# Altium PCB video.altium-ascii.PcbDoc (part 3 of 5)
Units mil, origin at the board's own origin, x right, y up, seen from the top; angles counter-clockwise.
Board outline 12285 x 4200 mil, 4 copper layers (top_copper, Mid-Layer 1, Mid-Layer 2, Bottom Layer), stack 68.6 mil thick; 189 components, 588 nets, 2118 pads, 808 vias.
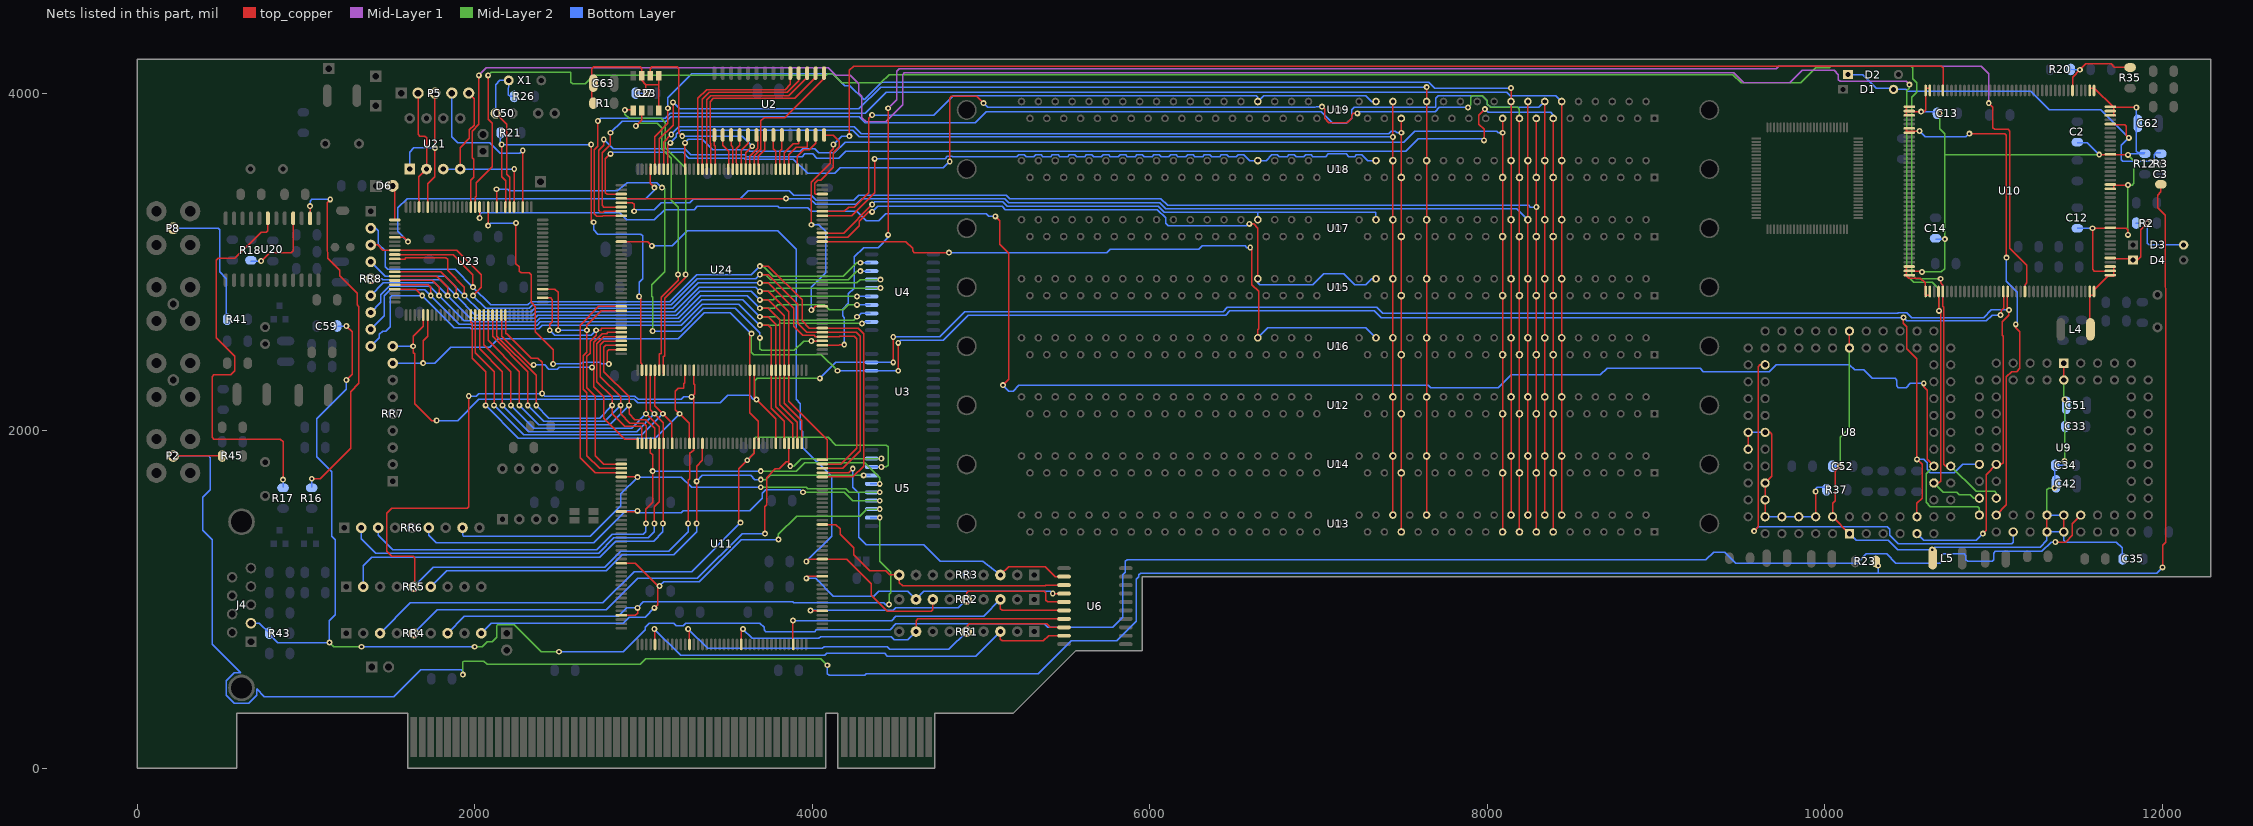
[diagram p5: the nets of this part, all layers, seen from the top]

## Via types
v1: diameter 35, hole 15.75, top_copper to Bottom Layer, 807 vias
v2: diameter 31.5, hole 15.75, top_copper to Bottom Layer, 1 vias

## Nets (pads, with @x,y where several pads share a name; then routed paths per layer and width w, separated by ;. In a path a pad name is that pad's centre, name@x,y a point inside that pad or via, vN(x,y) a via of type N, cw(c..) or ccw(c..) an arc to the next point about the centre after c; other vN are vias at no path point) (continued)
/DQ6: RR7.8 U3.8 U8.10 U9.20 U10.99 U11.92 U23.6 U24.27 | length 12913.7
  top_copper w7.87: v1(1695,2400) 1695,2533 1722,2560 U23.6@1722,2690 ; v1(3640,2575) 3630,2575 3630,2340 3630,2106 3681,2055 U11.92@3681,1943 ; v1(4510,2355) v1(4510,2520) ; v1(10465,2670) 10465,2635 10485,2615 10485,2485 10545,2425 v1(10545,1830) 10575,1800 10575,1600 10545,1570 U8.10@10545,1490 ; v1(11040,2685) 11045,2690 11045,2712 11058,2725 U10.99@11058,2802
  Mid-Layer 2 w7.87: v1(3640,2575) 3640,2465 3655,2450 4055,2450 v1(4150,2355)
  Bottom Layer w7.87: RR7.8@1515,2400 1765,2400 1860,2495 2090,2495 2140,2545 3205,2545 3360,2700 3515,2700 v1(3640,2575) ; v1(4150,2355) 4345,2355 v1(4510,2355) ; v1(4510,2520) 4525,2535 4775,2535 4925,2685 6450,2685 6475,2710 7330,2710 7370,2670 v1(10465,2670) 10485,2650 10955,2650 10990,2685 v1(11040,2685) ; v1(10545,1830) 10585,1830 10605,1810 10605,1770 10625,1750 10765,1750 10815,1800 U9.20@10915,1800
/DQ7: RR7.9 U3.9 U8.9 U9.21 U10.100 U11.88 U23.5 U24.28 | length 13091.4
  top_copper w7.87: U23.5@1696,2690 1696,2620 1636,2560 v1(1636,2500) 1636,2460 1645,2460 1645,2160 1745,2060 v1(1775,2060) ; U24.28@3656,2340 3656,2198 v1@3670,2184 ; v1(3670,2185) v1@3670,2184 ; U11.88@3784,1943 3784,2070 v1@3670,2184 ; v1(4480,2405) v1(4480,2555) ; v1(10935,1390) 10955,1410 10955,1740 U9.21@11015,1800 11045,1800 11055,1810 11055,2560 11050,2565 11050,2645 11090,2685 v1(11090,2715) 11080,2715 11080,2800 U10.100@11083,2802
  Mid-Layer 2 w7.87: v1(3670,2185) 3660,2185 3660,2295 3675,2310 v1(4045,2310)
  Bottom Layer w7.87: RR7.9@1515,2500 v1(1636,2500) ; v1(1775,2060) 1900,2060 2025,2185 2945,2185 2965,2165 3455,2165 3500,2210 3630,2210 3650,2185 v1(3670,2185) ; v1(4045,2310) 4140,2405 4345,2405 v1(4480,2405) ; v1(4480,2555) 4755,2555 4905,2705 6435,2705 6460,2730 7345,2730 7380,2695 10430,2695 10435,2700 10485,2700 10515,2670 10940,2670 10985,2715 v1(11090,2715) ; U8.9@10545,1390 10585,1350 10895,1350 v1(10935,1390)
/DQ8: RR8.9 U4.2 U11.86 U23.97 U24.32 | length 4346.9
  top_copper w7.87: U23.97@1530,2839 1651,2839 v1(1690,2800) ; v1(3690,2625) 3740,2625 3758,2607 3758,2340 3758,2132 3835,2055 U11.86@3835,1943
  Mid-Layer 2 w7.87: v1(3690,2625) 3800,2625 3810,2635 v1(4295,2635)
  Bottom Layer w7.87: RR8.9@1385,2500 1435,2550 1435,2570 1455,2590 1475,2590 1500,2615 1500,2790 1510,2800 v1(1690,2800) 1880,2610 1975,2610 1980,2605 2380,2605 2400,2625 3225,2625 3350,2750 3565,2750 v1(3690,2625) ; v1(4295,2635) 4305,2645 U4.2@4345,2645
/DQ9: RR8.8 U4.3 U11.84 U23.96 U24.33 | length 4451.3
  top_copper w7.87: U23.96@1530,2864 1726,2864 1740,2850 v1(1740,2800) ; v1(3690,2675) 3740,2675 3784,2631 3784,2340 3784,2142 3886,2040 U11.84@3886,1943
  Mid-Layer 2 w7.87: v1(3690,2675) 3790,2675 3810,2655 4245,2655 v1(4265,2675)
  Bottom Layer w7.87: RR8.8@1385,2600 1465,2680 1465,2800 1500,2835 1705,2835 v1(1740,2800) 1910,2630 1980,2630 1985,2625 2370,2625 2390,2645 3215,2645 3345,2775 3590,2775 v1(3690,2675) ; v1(4265,2675) 4270,2675 4290,2695 U4.3@4345,2695
/DQ10: RR8.7 U4.4 U11.83 U23.95 U24.34 | length 4495.8
  top_copper w7.87: U23.95@1530,2890 1750,2890 1790,2850 v1(1790,2800) ; v1(3690,2725) 3740,2725 3809,2656 3809,2340 3809,2153 3912,2050 U11.83@3912,1943
  Mid-Layer 2 w7.87: v1(3690,2725) 3775,2725 3795,2745 4070,2745 4100,2715 4185,2715 4215,2745 v1(4265,2745)
  Bottom Layer w7.87: RR8.7@1385,2700 1445,2760 1445,2805 1495,2855 1735,2855 v1(1790,2800) 1940,2650 1985,2650 1990,2645 2365,2645 2385,2665 3205,2665 3340,2800 3615,2800 v1(3690,2725) ; v1(4265,2745) U4.4@4345,2745
/DQ11: RR8.6 U4.5 U11.82 U23.94 U24.35 | length 4523.8
  top_copper w7.87: U23.94@1530,2915 1775,2915 1840,2850 v1(1840,2800) ; v1(3690,2775) 3740,2775 3835,2680 3835,2340 3835,2162 3937,2060 U11.82@3937,1943
  Mid-Layer 2 w7.87: v1(3690,2775) 3770,2775 3790,2795 v1(4265,2795)
  Bottom Layer w7.87: RR8.6@1385,2800 1460,2875 1765,2875 v1(1840,2800) 1970,2670 1990,2670 1995,2665 2355,2665 2375,2685 3195,2685 3335,2825 3640,2825 v1(3690,2775) ; v1(4265,2795) U4.5@4345,2795
/DQ12: RR8.5 U4.6 U11.80 U23.93 U24.36 | length 4907.7
  top_copper w7.87: U23.93@1530,2941 1799,2941 1890,2850 v1(1890,2800) ; v1(3690,2825) 3740,2825 3861,2704 3861,2340 3861,2174 4090,1945 4090,1828 U11.80@4078,1828
  Mid-Layer 2 w7.87: v1(3690,2825) 3770,2825 3790,2845 v1(4405,2845)
  Bottom Layer w7.87: RR8.5@1385,2900 1450,2900 1455,2895 1795,2895 v1(1890,2800) 2005,2685 2345,2685 2365,2705 3185,2705 3330,2850 3665,2850 v1(3690,2825) ; U4.6@4345,2845 v1(4405,2845)
/DQ13: RR8.4 U4.7 U11.79 U23.90 U24.45 | length 5509.6
  top_copper w7.87: U23.90@1530,3018 1535,3017 1585,3017 1593,3025 1830,3025 1840,3015 1840,2950 1940,2850 v1(1940,2800) ; v1(3690,2875) 3740,2875 3890,2725 3890,2620 3945,2565 4015,2565 4015,2557 4078,2557 4160,2557 4163,2560 4250,2560 4265,2545 4265,1897 4170,1802 U11.79@4078,1802
  Mid-Layer 2 w7.87: v1(3690,2875) 4265,2875 4285,2895 v1(4405,2895)
  Bottom Layer w7.87: RR8.4@1385,3000 1470,2915 1825,2915 v1(1940,2800) 2035,2705 2335,2705 2355,2725 3175,2725 3325,2875 v1(3690,2875) ; U4.7@4345,2895 v1(4405,2895)
/DQ14: RR8.3 U4.8 U11.78 U23.88 U24.46 | length 5113.8
  top_copper w7.87: RR8.3@1385,3100 1425,3100 1456.02,3068.98 U23.88@1526.02,3068.98 ; U23.88@1530,3069 1560,3070 1895,3070 2040,2925 2040,2850 v1(1990,2800) ; v1(3690,2925) 3740,2925 3915,2750 3915,2635 3967,2583 4078,2583 4262,2583 4285,2560 4285,1882 4180,1777 U11.78@4078,1777
  Mid-Layer 2 w7.87: v1(3690,2925) 3725,2925 3755,2895 4215,2895 4265,2945 v1(4285,2945)
  Bottom Layer w7.87: v1(1990,2800) 2065,2725 2325,2725 2345,2745 3165,2745 3320,2900 3665,2900 v1(3690,2925) ; v1(4285,2945) U4.8@4345,2945
/DQ15: RR8.2 U4.9 U11.76 U23.89 U24.47 | length 5880.2
  top_copper w7.87: U23.89@1530,3043 1872,3043 1990,2925 v1(1990,2850) ; v1(3690,2975) 3740,2975 3940,2775 3940,2650 3982,2608 4078,2608 4272,2608 4305,2575 4305,1790 4240,1726 U11.76@4078,1726
  Mid-Layer 2 w7.87: v1(3690,2975) 3710,2975 3770,2915 4185,2915 4265,2995 v1(4285,2995)
  Bottom Layer w7.87: RR8.2@1385,3200 1415,3200 1430,3185 1430,3105 1470,3065 1470,2970 1485,2955 1885,2955 v1(1990,2850) 2095,2745 2315,2745 2335,2765 3155,2765 3315,2925 3640,2925 v1(3690,2975) ; v1(4285,2995) U4.9@4345,2995
/DQ16: RR4.7 U5.2 U11.157 | length 3450.6
  top_copper w7.87: U11.157@2850,906 2952.5,906 2965,918.5 v1(2965,950)
  Mid-Layer 2 w7.87: v1(4400,1485) 4400,1225 4465,1160 4465,1040 4455,1030 v1(4455,970)
  Bottom Layer w7.87: RR4.7@1840,800 1940,900 2850,900 2900,950 v1(2965,950) 3000,985 3885,985 3890,980 4425,980 4435,970 v1(4455,970) ; U5.2@4345,1485 v1(4400,1485)
/DQ17: RR4.9 U5.3 U11.145 | length 3092
  top_copper w7.87: U11.145@2850,1214 2951,1214 v1@3085,1080 ; v1(3065,950) 3085,970 v1@3085,1080 ; v1(3095,1080) v1@3085,1080
  Mid-Layer 2 w7.87: v1(3800,1355) 3800,1385 3909,1494 4283,1494 4324,1535 v1(4400,1535)
  Bottom Layer w7.87: RR4.9@2040,800 2100,860 2880,860 2915,895 3010,895 v1(3065,950) ; v1(3095,1080) 3120,1105 3330,1105 3580,1355 v1(3800,1355) ; U5.3@4345,1535 v1(4400,1535)
/DQ18: RR6.6 U5.4 U11.133 | length 3092
  top_copper w7.87: U11.133@2850,1521 2965,1521 v1(2965,1525)
  Mid-Layer 2 w7.87: v1(3945,1635) 4190,1635 4240,1585 v1(4400,1585)
  Bottom Layer w7.87: RR6.6@1728.58,1425 1728.58,1380.46 1774.04,1335 2705,1335 2895,1525 v1(2965,1525) 2975,1515 3225,1515 3235,1525 3630,1525 3705,1600 3705,1630 3725,1650 3930,1650 v1(3945,1635) ; U5.4@4345,1585 v1(4400,1585)
/DQ19: RR6.8 U5.5 U11.125 | length 2912.5
  top_copper w7.87: U11.125@2850,1726 2965,1726 v1(2965,1725)
  Mid-Layer 2 w7.87: v1(3695,1665) 3965,1665 3975,1655 4200,1655 4220,1635 v1(4400,1635)
  Bottom Layer w7.87: RR6.8@1928.58,1425 1928.58,1380.46 1934.04,1375 2685,1375 2865,1555 2865,1625 v1(2965,1725) 3225,1725 3285,1665 v1(3695,1665) ; U5.5@4345,1635 v1(4400,1635)
/DQ20: RR6.3 U5.6 U11.117 | length 3768.2
  top_copper w7.87: v1(3015,1450) 3015,1535 3055,1575 v1(3055,1760) 3055,1856 3041,1870 U11.117@3041,1943
  Mid-Layer 2 w7.87: v1(3695,1760) 3905,1760 3955,1810 4310,1810 4400,1720 v1(4400,1685)
  Bottom Layer w7.87: RR6.3@1428.58,1425 1428.58,1380.46 1514.04,1295 2725,1295 2815,1385 3000,1385 3015,1400 v1(3015,1450) ; v1(3055,1760) v1(3695,1760) ; U5.6@4345,1685 v1(4400,1685)
/DQ21: RR5.6 U5.7 U11.105 | length 3331.9
  top_copper w7.87: v1(3315,1450) v1(3315,1700) 3315,1790 3349,1824 U11.105@3349,1943
  Mid-Layer 2 w7.87: v1(3695,1710) 3725,1710 3750,1735 v1(4305,1735)
  Bottom Layer w7.87: RR5.6@1740,1075 1835,1170 2780,1170 2875,1265 3180,1265 3315,1400 v1(3315,1450) ; v1(3315,1700) 3350,1735 3635,1735 3660,1710 v1(3695,1710) ; v1(4305,1735) U5.7@4345,1735
/DQ22: RR4.3 U5.8 U11.93 | length 4118.8
  top_copper w7.87: v1(3575,1455) 3565,1465 3565,1775 v1(3615,1825) 3656,1866 U11.93@3656,1943
  Mid-Layer 2 w7.87: v1(3615,1825) 3655,1865 3655,1950 3665,1960 4095,1960 4140,1915 4440,1915 4450,1905 4450,1795 4440,1785 v1(4410,1785)
  Bottom Layer w7.87: RR4.3@1440,800 1620,980 2760,980 2945,1165 3285,1165 v1(3575,1455) ; U5.8@4345,1785 v1(4410,1785)
/DQ23: RR4.5 U5.9 U11.85 | length 3610.6
  top_copper w7.87: v1(3720,1390) 3720,1550 3730,1560 3730,1720 3780,1775 3805,1775 3845,1815 3860,1815 ; U11.85@3861,1943 3861,1816 3860,1815 ; v1(3870,1790) 3870,1795 3860,1805 3860,1815
  Mid-Layer 2 w7.87: v1(3870,1790) 3890,1790 3935,1835 v1(4410,1835)
  Bottom Layer w7.87: RR4.5@1640,800 1780,940 2780,940 2965,1125 3320,1125 3585,1390 v1(3720,1390) ; U5.9@4345,1835 v1(4410,1835)
/DQ24: RR3.3 U6.2 U11.77 | length 1934.1
  top_copper w7.87: U11.77@4078,1751 4216,1751 v1(4240,1775) ; RR3.3@5115,1145 5165,1195 5380,1195 5440,1135 U6.2@5485,1135
  Bottom Layer w7.87: v1(4240,1775) 4240,1665 4275,1630 4275,1370 4320,1325 4660,1325 4760,1225 5010,1225 RR3.3@5115,1145
/DQ25: RR3.9 U6.3 U11.65 | length 1629.9
  top_copper w7.87: U11.65@4078,1444 4140,1444 4165,1420 4165,1385 4245,1305 4245,1265 4340,1170 4435,1170 4460,1145 RR3.9@4515,1145 4515,1100 4535,1080 5380,1080 5385,1085 U6.3@5485,1085
/DQ26: RR2.8 U6.4 U11.53 | length 1750.1
  top_copper w7.87: v1(3965,1125) 3965,1137 U11.53@4078,1137 ; v1(5425,1035) U6.4@5485,1035
  Bottom Layer w7.87: v1(3965,1125) 4020,1125 4125,1020 4365,1020 4395,1050 4565,1050 RR2.8@4615,1000 4660,1050 5410,1050 v1(5425,1035)
/DQ27: RR2.5 U6.5 U11.45 | length 1710.4
  top_copper w7.87: v1(3990,935) 3990,932 U11.45@4078,932 ; RR2.5@4915,1000 4915,1040 4925,1050 5375,1050 5385,1040 5385,995 5395,985 U6.5@5485,985
  Bottom Layer w7.87: v1(3990,935) 4480,935 4495,950 4865,950 RR2.5@4915,1000
/DQ28: RR2.3 U6.6 U11.37 | length 1869.9
  top_copper w7.87: U11.37@3886,715 v1(3886,875) ; RR2.3@5115,1000 5115,945 5125,935 U6.6@5485,935
  Bottom Layer w7.87: v1(3886,875) 4470,875 4495,900 5015,900 RR2.3@5115,1000
/DQ29: RR1.8 U6.7 U11.25 | length 2139.4
  top_copper w7.87: U11.25@3579,715 3579,825 v1(3590,825) ; RR1.8@4615,810 4615,875 4625,885 U6.7@5485,885
  Bottom Layer w7.87: v1(3590,825) 3645,770 4040,770 4050,780 4468,780 4486,762 4567,762 RR1.8@4615,810
/DQ30: RR1.5 U6.8 U11.13 | length 2483
  top_copper w7.87: v1(3265,825) 3272,825 U11.13@3272,715 ; RR1.5@4915,810 4920,815 4920,845 4930,855 5390,855 5410,835 U6.8@5485,835
  Bottom Layer w7.87: v1(3265,825) 3380,710 4060,710 4070,720 4445,720 4460,705 4810,705 RR1.5@4915,810
/DQ31: RR1.3 U6.9 U11.5 | length 2728.2
  top_copper w7.87: v1(3065,825) 3067,825 U11.5@3067,715 ; RR1.3@5115,810 5115,765 5125,755 5370,755 5400,785 U6.9@5485,785
  Bottom Layer w7.87: v1(3065,825) 3220,670 4075,670 4085,680 4430,680 4445,665 4970,665 RR1.3@5115,810
/ESVIDEO-RVB/OE_RVB-: U8.57 U9.29 | length 2700.9
  top_copper w7.87: v1(9580,1405) 9605,1430 9605,2380 9615,2390 U8.57@9645,2390
  Bottom Layer w7.87: v1(9580,1405) 9605,1430 10370,1430 10385,1415 10385,1380 10435,1330 11105,1330 11115,1340 U9.29@11115,1400
/ESVIDEO-RVB/REF+: R37.2 U8.64 U8.65 U8.66 U8.71 U8.73 U8.76 U8.78 U8.80 U8.82 | length 1294.9
  top_copper w7.87: U8.66@9545,1890 U8.64@9545,1990 ; U8.76@9645,1490 U8.73@9645,1590 U8.71@9645,1690 9685,1730 9685,1980 9675,1990 U8.65@9645,1990 ; U8.82@9945,1490 v1(9945,1640)
  Bottom Layer w7.87: U8.64@9545,1990 U8.65@9645,1990 ; U8.76@9645,1490 U8.78@9745,1490 U8.80@9845,1490 U8.82@9945,1490 ; v1(9945,1640) 9945,1655 9955,1665 10005,1665 R37.2@10005,1650
/ESVIDEO-RVB/VAA: C33.1 C34.1 C35.1 C42.1 C51.1 C52.1 L5.2 U8.1 U8.43 U8.44 U8.84 U9.1 U9.2 U9.33 U9.34 U9.35 U9.36 | length 4699
  top_copper w7.87: v1(10090,1790) 10060,1760 10060,1585 10045,1570 U8.84@10045,1490 U8.1@10145,1390 ; U8.44@10145,2490 U8.43@10145,2590 ; L5.2@10635,1245 v1(10635,1295) ; U9.33@11315,1400 U9.34@11315,1500 ; U9.35@11415,1400 U9.36@11415,1500 ; U9.2@11415,2300 U9.1@11415,2400
  Mid-Layer 2 w7.87: v1(10090,1790) 10090,1960 10145,2015 U8.44@10145,2490 ; U9.34@11315,1500 11315,1650 11325,1660 v1(11360,1660) ; U9.2@11415,2300 11415,2190 v1(11420,2185) v1(11420,1820)
  Bottom Layer w7.87: C52.1@10040,1790 v1(10090,1790) ; U8.1@10145,1390 10185,1350 10375,1350 10430,1295 v1(10635,1295) 10650,1310 11275,1310 11315,1350 U9.33@11315,1400 U9.35@11415,1400 11415,1350 11425,1340 11725,1340 11760,1305 C35.1@11760,1240 ; U9.34@11315,1500 U9.36@11415,1500 ; v1(11360,1660) 11360,1685 11360,1795 11410,1795 11420,1805 v1(11420,1820) ; C33.1@11420,2025 11420,2150 v1(11420,2185)
/F_PALIN: U10.104 U24.43 | length 9877.8
  top_copper w7.87: U24.43@4078,2506 4160,2506 4160,2510 v1(4190,2510) ; v1(4450,3160) v1(4450,3910) ; v1(10970,3940) 10995,3915 10995,3795 11005,3785 11085,3785 11095,3775 11095,3080 11195,2980 11195,2875 11185,2865 U10.104@11185,2805
  Mid-Layer 1 w7.87: v1(4450,3910) 4500,3960 4500,4130 4515,4145 9710,4145 9725,4160 10925,4160 10970,4115 v1(10970,3940)
  Bottom Layer w7.87: v1(4190,2510) 4190,2670 4180,2680 4180,2720 4215,2755 4215,2810 4250,2845 4250,3030 4305,3085 4390,3085 4450,3145 v1(4450,3160)
/graphic/14MHZOUT: U7.6 U24.95 | length 1200
  top_copper w7.87: U7.6@3040,4105 3040,4145 3050,4155 3200,4155 3210,4145 3210,3765 v1(3230,3745) ; U24.95@3605,3568 3605,3645 v1(3645,3685)
  Bottom Layer w7.87: v1(3230,3745) 3585,3745 v1(3645,3685)
/graphic/CCLK: P5.2 U21.2 U23.77 | length 737.3
  top_copper w7.87: P5.2@1665,4000 1665,3755 1675,3745 1705,3745 1715,3735 U21.2@1715,3550 1670,3505 1670,3368.87 1671,3367.87 U23.77@1671,3320
/graphic/CLK10MHz: R21.2 U23.57 U24.2 | length 2635.9
  top_copper w7.87: v1(2160,3695) 2160,3503 2183,3480 U23.57@2183,3320 ; v1(2690,3695) 2690,3250 v1(2705,3235) ; v1(2975,2795) 2985,2785 2985,2400 2990,2400 U24.2@2990,2340
  Bottom Layer w7.87: R21.2@2152.3,3765 2152.3,3702.7 v1(2160,3695) v1(2690,3695) ; v1(2705,3235) 2705,3190 2730,3165 2985,3165 2995,3155 2995,2900 2975,2880 v1(2975,2795)
/graphic/CSIO-: U23.61 U24.159 | length 1718.2
  top_copper w7.87: v1(2080,3215) U23.61@2080,3320 ; v1(2245,3230) 2245,2990 2265,2970 2265,2945 2275,2935 2325,2935 2335,2925 2335,2760 2360,2735 2360,2585 2465,2480 v1(2465,2395) ; v1(2795,2395) 2785,2405 2785,2470 2795,2480 U24.159@2850,2480
  Bottom Layer w7.87: v1(2080,3215) 2095,3230 v1(2245,3230) ; v1(2465,2395) 2630,2395 2640,2405 2740,2405 2750,2395 v1(2795,2395)
/graphic/DIN: P5.3 U21.1 U23.75 | length 958.2
  top_copper w7.87: U23.75@1722,3320 1722,3462 1765,3505 v1(1765,3675) P5.3@1765,4000
  Bottom Layer w7.87: U21.1@1615,3550 1615,3650 1640,3675 v1(1765,3675)
/graphic/DONE: P5.4 U23.53 | length 1067.6
  top_copper w7.87: U23.53@2285,3320 v1(2285,3660)
  Bottom Layer w7.87: P5.4@1865,4000 1865,3740 1900,3705 2090,3705 2152.5,3642.5 2267.5,3642.5 v1(2285,3660)
/graphic/HDOUT: U7.1 U24.7 | length 1931.1
  top_copper w7.87: v1(2890,3900) 2935,3900 U7.1@2940,3895 ; U24.7@3118,2340 3118,2440 3125,2440 3125,2785 3250,2910 v1(3250,2925)
  Mid-Layer 2 w7.87: v1(2890,3900) 2890,3875.25 2915.25,3850 3105,3850 3130,3825 3130,3675 3250,3555 v1(3250,2925)
/graphic/HDREFOUT: U7.2 U24.6 | length 1827.6
  top_copper w7.87: v1(2955,3804.94) 2990,3839.94 U7.2@2990,3896.65 ; U24.6@3093,2340 3093,2455 3105,2455 3105,2790 3205,2890 v1(3205,2925)
  Mid-Layer 2 w7.87: v1(2955,3804.94) 2972.5,3822.44 3082.56,3822.44 3110,3795 3110,3670 3165,3615 3165,3365 3205,3325 v1(3205,2925)
/graphic/IA0: U2.6 U24.94 | length 205.6
  top_copper w7.87: U24.94@3630,3568 3630,3626 3678.57,3674.57 3678.57,3741.39 U2.6@3670,3749.96
/graphic/IA1: U2.7 U24.92 | length 198.1
  top_copper w7.87: U24.92@3681,3568 3681,3625 3720,3664 U2.7@3720,3749.96
/graphic/IA2: U2.8 U24.88 | length 187.8
  top_copper w7.87: U2.8@3770,3749.96 3770,3669 3784,3655 U24.88@3784,3568
/graphic/IA3: U2.9 U24.87 | length 186.5
  top_copper w7.87: U24.87@3809,3568 3809,3655 3820,3666 U2.9@3820,3749.96
/graphic/IA4: U2.11 U24.86 | length 233.2
  top_copper w7.87: U24.86@3835,3568 3835,3645 3888.78,3698.78 3916.06,3698.78 3920,3702.72 U2.11@3920,3749.96
/graphic/IA5: U2.12 U24.85 | length 265.2
  top_copper w7.87: U24.85@3861,3568 3861,3636 3905,3680 3970,3680 U2.12@3970,3749.96
/graphic/IA6: U2.13 U24.83 | length 245.6
  top_copper w7.87: U24.83@3912,3568 3912,3625.87 3912,3627 3949.25,3664.25 3981.53,3664.25 4020,3702.72 U2.13@4020,3749.96
/graphic/IA7: U2.14 U24.78 | length 546.6
  top_copper w7.87: U2.14@4070,3749.96 4123.43,3749.96 4123.47,3750 4159.37,3714.1 4159.37,3680.9 4125,3646.53 4125,3560 4050,3485 4033.31,3485 4014.23,3465.92 4014.23,3407.77 4020,3402 U24.78@4078,3402
/graphic/IA8: U2.15 U24.93 | length 794.8
  top_copper w7.87: U24.93@3656,3568 3656,3627.74 3695,3666.74 3695,3835 3715,3855 3836.62,3855 4070,4088.38 U2.15@4070,4120.04
/graphic/IA9: U2.5 U24.96 | length 198.6
  top_copper w7.87: U24.96@3579,3568 3580,3585 3580,3662.59 3620,3702.59 U2.5@3620,3749.96
/graphic/ICAS-: U2.17 U24.104 | length 1071
  top_copper w7.87: U24.104@3374,3568 3374,3961 3398,3985 3862.52,3985 3970,4092.48 U2.17@3970,4120.04
/graphic/ID0: U2.1 U24.102 | length 184.1
  top_copper w7.87: U2.1@3420,3750 3420,3690 3425,3685 U24.102@3425,3568
/graphic/ID1: U2.2 U24.99 | length 196.8
  top_copper w7.87: U2.2@3470,3750 3470,3690 3505,3655 3505,3585 U24.99@3502,3568
/graphic/ID2: U2.18 U24.105 | length 1059.3
  top_copper w7.87: U24.105@3349,3568 3349,3964 3389.75,4004.75 3851.96,4004.75 3920,4072.8 U2.18@3920,4120.04
/graphic/ID3: U2.19 U24.106 | length 1050.1
  top_copper w7.87: U24.106@3323,3568 3323,3968 3375.63,4020.63 3839.1,4020.63 3870,4051.53 U2.19@3870,4120.04
/graphic/IOE-: U2.16 U24.103 | length 1095.6
  top_copper w7.87: U24.103@3400,3568 3400,3698.72 3395,3703.72 3395,3950 3414.25,3969.25 3896.77,3969.25 4020,4092.48 U2.16@4020,4120.04
/graphic/IRAS-: U2.4 U24.97 | length 190.4
  top_copper w7.87: U24.97@3553,3568 3550,3600 3550,3670 3570,3690 U2.4@3570,3749.96
/graphic/IWR-: U2.3 U24.98 | length 186.3
  top_copper w7.87: U2.3@3520,3750 3520,3690 3530,3680 3530,3585 U24.98@3528,3568
/graphic/LED: D6.2 U23.81 | length 206.5
  top_copper w7.87: D6.2@1515,3450 1526.02,3438.98 U23.81@1526.02,3248.11
/graphic/PROG*: P5.5 U21.3 U21.4 U23.55 | length 1148.8
  top_copper w7.87: U21.4@1915,3550 1915,3677.22 1969.25,3731.47 1969.25,3781.52 1998.46,3810.74 1998.46,3966.54 P5.5@1965,4000 ; U23.55@2234,3320 2234,3399 2235,3400 v1(2235,3550)
  Bottom Layer w7.87: U21.3@1815,3550 U21.4@1915,3550 v1(2235,3550)
/graphic/RESERV1: U23.59 U24.44 | length 3280.5
  top_copper w7.87: v1(2130,3430) 2130,3320 U23.59@2132,3320 ; v1(3995,2531) U24.44@4078,2531
  Mid-Layer 2 w7.87: v1(3055,2590) 3055,2790 3050,2795 3050,2865 3125,2940 3125,3435 v1(3110,3440) ; v1(3690,2550) 3690,2486 3700,2476 3895,2476 3950,2531 v1(3995,2531)
  Bottom Layer w7.87: v1(2130,3430) 2195,3430 2205,3420 2845,3420 2905,3470 3080,3470 v1(3110,3440) ; v1(3055,2590) 3220,2590 3355,2725 3545,2725 3690,2580 v1(3690,2550)
/graphic/VOSC: C23.1 C63.1 R1.1 U7.4 U7.5 U7.7 | length 1012.8
  top_copper w7.87: R1.1@2700,3940 2695,3955 2695,4050 2695,4145 2705,4155 2980,4155 2990,4145 U7.7@2990,4105 ; U7.7@2990,4103.35 2990,4075 3015,4050 ; v1(3015,4000) 3015,4050 ; U7.4@3090,3895 U7.5@3090,4105 ; 3090,4050 3015,4050
  Bottom Layer w7.87: C23.1@2950,4000 v1(3015,4000)
/graphic/X_DIN: U23.85 U24.117 | length 2024.1
  top_copper w7.87: U23.85@1530,3146 1540,3145 1580,3145 v1(1605,3120) ; U24.117@3040,3565 3040,3465 v1(3065,3440)
  Bottom Layer w7.87: v1(1605,3120) 1545,3180 1545,3320 1600,3375 3015,3375 3065,3425 v1(3065,3440)
/graphic/XTAL_I: C50.1 R26.1 U23.56 X1.2 | length 971
  top_copper w7.87: C50.1@2125,3880 2189.31,3815.69 2189.31,3518.69 2208,3500 U23.56@2208,3320
  Bottom Layer w7.87: C50.1@2125,3880 2125,4050 2150,4075 X1.2@2202.09,4075 2200,3990 2210,3980 R26.1@2230,3980
/GREEN_IN: C3.2 P2.1 R23.1 R45.1 | length 16712.9
  top_copper w7.87: P2.1@215,1850 R45.1@500,1850 ; R23.1@10305,1225 10315,1225 v1(10315,1200) ; C3.2@11990,3455 11990,3415 11970,3395 11970,3320 12015,3275 12015,2850 12020,2845 12020,1340 12000,1320 v1(12000,1190)
  Mid-Layer 2 w7.87: v1(1930,555) 1930,630 1935,635 2055,635 2075,615 2980,615 3015,650 4050,650 v1(4090,610)
  Bottom Layer w7.87: P2.1@215,1850 425,1850 435,1840 435,1650 390,1605 390,1410 445,1355 445,735 613.46,566.54 575.63,566.54 528.54,519.45 528.54,432.52 575.63,385.43 662.56,385.43 709.65,432.52 709.65,470.35 755,425 1520,425 1680,585 1920,585 1930,575 v1(1930,555) ; v1(4090,610) 4090,560 4100,550 4310,550 4320,560 5340,560 5535,755 5805,755 5920,870 5920,1120 5935,1135 5935,1145 5945,1155 10315,1155 ; v1(10315,1200) 10315,1155 ; v1(12000,1190) 11965,1155 10315,1155
/GREEN_OUT: C59.2 J4.2 R43.2 U9.38 | length 14010
  top_copper w7.87: v1(1240,2300) 1275,2335 1275,2585 v1(1240,2620) ; v1(11365,1340) 11425,1340 11465,1380 11465,1450 U9.38@11515,1500
  Mid-Layer 2 w7.87: v1(1140,745) 1165,720 v1(1330,720) ; v1(2000,720) 2045,720 2075,750 2105,750 2130,775 2130,845 2135,850 2235,850 2395,690 v1(2500,690)
  Bottom Layer w7.87: J4.2@665,860 725,860 785,800 780,800 835,745 v1(1140,745) 1140,875 1175,910 1175,1352.6 1153.78,1373.82 1153.78,1756.22 1065,1845 1065,2070 1240,2245 v1(1240,2300) ; C59.2@1190,2620 v1(1240,2620) ; v1(1330,720) v1(2000,720) ; v1(2500,690) 2880,690 3010,820 3010,835 3035,860 3180,860 3195,845 3235,845 3250,860 3690,860 3715,835 3715,820 3725,810 4015,810 4025,820 4461,820 4496,855 5375,855 5395,835 5780,835 5840,895 5840,1145 5855,1160 5855,1225 5865,1235 9295,1235 9340,1280 9405,1280 9470,1215 10190,1215 10245,1270 10365,1270 10420,1215 10680,1215 10690,1225 10690,1260 10700,1270 10825,1270 10835,1260 10835,1235 10845,1225 10990,1225 11000,1235 11000,1275 11010,1285 11285,1285 11340,1340 v1(11365,1340)
/HD_PAL-: U10.36 U24.52 | length 8347
  top_copper w7.87: v1(3995,2715) 4000,2715 4015,2730 4015,2736 U24.52@4078,2736 ; v1(3995,3220) 3995,3470.94 4107.5,3583.44 4107.5,3652.75 4125,3670.25 v1(4125,3695) ; v1(4220,3745) 4220,4135 4245,4160 10690,4160 10700,4150 10700,4030 U10.36@10699,4030
  Bottom Layer w7.87: v1(3995,2715) 3995,2850 4080,2935 4080,3180 4040,3220 v1(3995,3220) ; v1(4125,3695) 4175,3745 v1(4220,3745)
/IRQ-: U11.124 U24.149 | length 1317.8
  top_copper w7.87: U11.124@2850,1751 2714,1751 2625,1840 2625,2625 2736,2736 U24.149@2850,2736
/IRQ_SRL: RR2.7 U11.57 U24.134 | length 4135.7
  top_copper w7.87: U24.134@2850,3120 3025,3120 v1(3050,3095) ; v1(3965,1225) 3979,1239 4078,1239 4205,1239 4350,1094 4350,1025 4445,930 4705,930 4715,940 RR2.7@4715,1000
  Bottom Layer w7.87: v1(3050,3095) 3170,3095 3260,3185 3795,3185 3905,3075 3905,2185 3930,2160 3930,2010 3945,1995 3945,1900 4115,1730 4115,1375 v1(3965,1225)
/modul/CHROM: R16.2 U20.14 | length 2155.8
  top_copper w7.87: U20.14@1025,3265 v1(1025,3330) ; v1(1035,1715) 1085,1715 1265,1895 1265,2230 1315,2280 1315,2735 1305,2745 1305,2815 1201.81,2918.19 1201.81,2950 1130.55,3021.26 1130.55,3058.19 1125.69,3063.05 1125.69,3350.69 v1(1145,3370)
  Bottom Layer w7.87: v1(1025,3330) 1025,3360 1035,3370 v1(1145,3370) ; R16.2@1035,1665 v1(1035,1715)
/modul/CVBS: R18.2 U20.16 | length 474.9
  top_copper w7.87: v1(735,3005) 785,3055 915,3055 925,3065 U20.16@925,3265
  Bottom Layer w7.87: R18.2@675,3005 v1(735,3005)
/modul/CVBSOUT: P8.1 R41.1 | length 825.7
  Bottom Layer w7.87: P8.1@215,3200 480,3200 490,3190 490,2940 530,2900 R41.1@530,2660
/modul/LUM: R17.2 U20.19 | length 2367.9
  top_copper w7.87: U20.19@775,3265 775,3185 765,3175 735,3175 580,3020 480,3020 470,3010 470,2550 580,2440 580,2355 555,2330 455,2330 445,2320 445,1960 455,1950 850,1950 865,1935 v1(865,1710)
  Bottom Layer w7.87: R17.2@865,1665 v1(865,1710)
/MXA0: U12.12 U13.12 U14.12 U15.12 U16.12 U17.12 U18.12 U19.12 U24.128 | length 8961.3
  top_copper w7.87: v1(2730,3834.31) 2730,3685 2710,3665 2710,3285 2725,3270 2760,3270 2760,3274 U24.128@2850,3274 ; U13.12@8440,1500 U14.12@8440,1850 U12.12@8440,2200 U16.12@8440,2550 U15.12@8440,2900 U17.12@8440,3250 U18.12@8440,3600 U19.12@8440,3950
  Bottom Layer w7.87: v1(2730,3834.31) 2747.5,3851.81 3130.19,3851.81 3158.38,3880 4315,3880 4440,4005 8115,4005 8135,3985 8405,3985 U19.12@8440,3950
/MXA1: U12.13 U13.13 U14.13 U15.13 U16.13 U17.13 U18.13 U19.13 U24.127 | length 8982.2
  top_copper w7.87: v1(2765,3725) 2765,3690 2735,3660 2735,3305 2745,3295 2765,3295 2765,3299 U24.127@2850,3299 ; v1(7980,3720) 7980,3785 7950,3815 7950,3870 v1(7985,3905) ; U13.13@8390,1400 U14.13@8390,1750 U12.13@8390,2100 U16.13@8390,2450 U15.13@8390,2800 U17.13@8390,3150 U18.13@8390,3500 U19.13@8390,3850
  Bottom Layer w7.87: v1(2765,3725) 2820,3670 3245,3670 3280.87,3634.13 3395.97,3634.13 3396.85,3633.25 3601,3633.25 3610.38,3623.88 3940.5,3623.88 3955.93,3639.31 4002.32,3639.31 4026.67,3614.95 4157.4,3614.95 4197.45,3655 7515,3655 7590,3730 7970,3730 v1(7980,3720) ; v1(7985,3905) 8005,3885 8375,3885 8390,3870 U19.13@8390,3850
/MXA2: U12.14 U13.14 U14.14 U15.14 U16.14 U17.14 U18.14 U19.14 U24.126 | length 8826.8
  top_copper w7.87: v1(2805,3765) 2805,3695 2755,3645 2755,3335 2765,3325 U24.126@2850,3325 ; U13.14@8340,1500 U14.14@8340,1850 U12.14@8340,2200 U16.14@8340,2550 U15.14@8340,2900 U17.14@8340,3250 U18.14@8340,3600 U19.14@8340,3950
  Bottom Layer w7.87: v1(2805,3765) 2874.25,3834.25 3134.9,3834.25 3160.65,3860 4280,3860 4315,3825 4965,3825 5030,3890 7015,3890 7085,3820 7165,3820 7195,3850 7195,3900 7210,3915 7690,3915 7695,3920 7695,3970 7710,3985 7970,3985 8000,3955 8000,3935 8020,3915 8305,3915 U19.14@8340,3950
/MXA3: U12.15 U13.15 U14.15 U15.15 U16.15 U17.15 U18.15 U19.15 U24.125 | length 8048.1
  top_copper w7.87: U24.125@2850,3350 2935,3350 2945,3340 v1(2945,3300) ; U13.15@8290,1400 U14.15@8290,1750 U12.15@8290,2100 U16.15@8290,2450 U15.15@8290,2800 U17.15@8290,3150 v1(8290,3325) U18.15@8290,3500 U19.15@8290,3850
  Bottom Layer w7.87: v1(2945,3300) 2955,3310 3065,3310 3105,3350 3275,3350 3295,3370 3570,3370 3620,3420 3865,3420 3890,3395 3995,3395 4025,3365 4245,3365 4275,3395 5150,3395 5170,3375 6065,3375 6105,3335 8245,3335 8255,3325 v1(8290,3325)
/MXA4: U12.16 U13.16 U14.16 U15.16 U16.16 U17.16 U18.16 U19.16 U24.124 | length 7920.8
  top_copper w7.87: U24.124@2850,3375 v1(3845,3375) ; U13.16@8240,1500 U14.16@8240,1850 U12.16@8240,2200 U16.16@8240,2550 U15.16@8240,2900 U17.16@8240,3250 U18.16@8240,3600 U19.16@8240,3950
  Bottom Layer w7.87: v1(3845,3375) 3985,3375 4020,3340 4260,3340 4295,3375 5140,3375 5165,3350 6060,3350 6095,3315 8175,3315 U17.16@8240,3250
/MXA5: U12.17 U13.17 U14.17 U15.17 U16.17 U17.17 U18.17 U19.17 U24.123 | length 8926.6
  top_copper w7.87: v1(2805,3640) 2775,3610 2775,3410 2785,3400 U24.123@2850,3400 ; v1(4815,3595) 4815,3970 4825,3980 4975,3980 v1(5015,3940) ; v1(7020,3920) 7035,3905 7035,3850 7060,3825 7170,3825 7195,3850 7195,3870 7205,3880 v1(7230,3880) ; U13.17@8190,1400 U14.17@8190,1750 U12.17@8190,2100 U16.17@8190,2450 U15.17@8190,2800 U17.17@8190,3150 U18.17@8190,3500 U19.17@8190,3850
  Mid-Layer 2 w7.87: v1(7885,3915) 7900,3930 7900,3975 7910,3985 7970,3985 8000,3955 8000,3935 8020,3915 8180,3915 8190,3905 U19.17@8190,3850
  Bottom Layer w7.87: v1(2805,3640) 2815,3650 3235,3650 3270,3615 3596.8,3615 3603.8,3608 3887.92,3608 3972.38,3523.55 4117.05,3523.55 4132.16,3523.55 4164.87,3556.25 4776.25,3556.25 v1(4815,3595) ; v1(5015,3940) 5040,3915 6980,3915 6985,3920 v1(7020,3920) ; v1(7230,3880) 7240,3890 7690,3890 7715,3915 v1(7885,3915)
/MXA6: U12.18 U13.18 U14.18 U15.18 U16.18 U17.18 U18.18 U19.18 U24.116 | length 8142.5
  top_copper w7.87: U24.116@3067,3568 3067,3742 3145,3820 v1(3145,3910) ; U13.18@8140,1500 U14.18@8140,1850 U12.18@8140,2200 U16.18@8140,2550 U15.18@8140,2900 U17.18@8140,3250 U18.18@8140,3600 U19.18@8140,3950 v1(8140,4030)
  Bottom Layer w7.87: v1(3145,3910) 3145,3973.38 3285.93,4114.31 4121.25,4114.31 4191.5,4044.07 4223.47,4044.07 4307.63,3959.9 4412.04,4064.31 7654.07,4064.31 7688.38,4030 v1(8140,4030)
/MXA7: U12.28 U13.28 U14.28 U15.28 U16.28 U17.28 U18.28 U19.28 U24.115 | length 7481.1
  top_copper w7.87: U24.115@3093,3568 3093,3728 3175.32,3810.32 v1(3175.32,3945.32) ; U13.28@7640,1500 U14.28@7640,1850 U12.28@7640,2200 U16.28@7640,2550 U15.28@7640,2900 U17.28@7640,3250 U18.28@7640,3600 U19.28@7640,3950 v1(7640,4035)
  Bottom Layer w7.87: v1(3175.32,3945.32) 3214.94,3905.69 4275.69,3905.69 4405,4035 v1(7640,4035)
/MXA8: U12.31 U13.31 U14.31 U15.31 U16.31 U17.31 U18.31 U19.31 U24.114 | length 7027
  top_copper w7.87: U24.114@3118,3568 3120,3570 3120,3710 v1(3165,3755) ; U13.31@7490,1400 U14.31@7490,1750 U12.31@7490,2100 U16.31@7490,2450 U15.31@7490,2800 U17.31@7490,3150 U18.31@7490,3500 v1(7490,3765) U19.31@7490,3850
  Bottom Layer w7.87: v1(3165,3755) 3210,3800 4250,3800 4290,3760 7415,3760 7430,3775 7455.25,3775 7465.25,3765 v1(7490,3765)
/MXA9: U12.32 U13.32 U14.32 U15.32 U16.32 U17.32 U18.32 U19.32 U24.113 | length 6929.9
  top_copper w7.87: U24.113@3144,3568 3145,3570 3145,3690 v1(3160,3705) ; U13.32@7440,1500 U14.32@7440,1850 U12.32@7440,2200 U16.32@7440,2550 U15.32@7440,2900 U17.32@7440,3250 U18.32@7440,3600 v1(7440,3740) U19.32@7440,3950
  Bottom Layer w7.87: v1(3160,3705) 3195,3740 3195,3755 3220,3780 4240,3780 4280,3740 v1(7440,3740)
/MXA10: U12.19 U13.19 U14.19 U15.19 U16.19 U17.19 U18.19 U19.19 U24.109 | length 7541.6
  top_copper w7.87: U24.109@3246,3568 v1(3246,3705) ; U13.19@8090,1400 U14.19@8090,1750 U12.19@8090,2100 U16.19@8090,2450 U15.19@8090,2800 U17.19@8090,3150 U18.19@8090,3500 v1(8090,3765) U19.19@8090,3850
  Bottom Layer w7.87: v1(3246,3705) 3266,3725 3350,3725 3410,3665 3621.53,3665 3630.9,3655.63 3633.2,3655.63 3927.7,3655.63 3942.88,3670.81 4015.72,3670.81 4039.82,3646.7 4131.7,3646.7 4195,3710 7505,3710 7570,3775 8055.25,3775 8065.25,3765 v1(8090,3765)
/OE_PAL-: U9.28 U10.46 U10.47 | length 3011.9
  top_copper w7.87: U10.47@10482,3762 10482,3775 ; U10.46@10482,3787 10482,3775 ; v1(10560,3775) 10482,3775 ; v1(10855,3760) 11065,3760 11075,3750 v1(11075,3025) ; U9.28@11015,1500 11075,1560 11075,2320 11105,2350 11135,2350 11155,2370 11155,2585 11130,2610 v1(11130,2630)
  Bottom Layer w7.87: v1(10560,3775) 10595,3740 10835,3740 v1(10855,3760) ; v1(11075,3025) 11075,2885 11140,2820 11140,2640 v1(11130,2630)
/pal-ntsc.sch/C-VIDEO: D3.2 D4.1 R2.1 U10.125 | length 797
  top_copper w7.87: U10.125@11710,3019 11816.86,3019 D4.1@11825,3010.86 11850.86,3010.86 11870,3030 11870,3190 v1(11910,3230)
  Bottom Layer w7.87: R2.1@11840,3230 v1(11910,3230) 11910,3110 11920,3100 D3.2@12125,3100
/pal-ntsc.sch/VAF: C2.1 C12.1 C13.1 C14.1 C62.1 L4.2 R12.2 U10.1 U10.2 U10.39 U10.40 U10.41 U10.42 U10.43 U10.78 U10.79 U10.80 U10.81 U10.82 U10.119 U10.120 U10.121 U10.122 U10.123 U10.132 U10.141 U10.142 U10.149 U10.158 U10.159 U10.160 | length 5790
  top_copper w7.87: U10.78@10482,2968 U10.79@10482,2943 ; U10.43@10482,3864 U10.42@10482,3890 ; U10.41@10482,3915 U10.42@10482,3890 ; v1(10575,2940) 10575,2943 U10.79@10482,2943 ; U10.82@10623,2802 10597,2802 10595,2805 10594,2805 10594,2875 10565,2904 10495,2904 10482,2917 U10.79@10482,2943 ; U10.39@10623,4030 10597,4030 10597,3900 10587,3890 v1(10570,3890) U10.42@10482,3890 ; U10.2@11570,4030 11595,4030 U10.160@11710,3915 ; L4.2@11575,2600 11570,2605 11570,2802 11595,2802 11595,2835 11675,2915 11710,2915 11710,2917 U10.122@11710,2943 ; v1(11625,3635) 11625,3634 11710,3634 v1(11795,3634) ; U10.123@11710,2968 U10.122@11710,2943 ; U10.141@11710,3429 11710,3455 v1(11795,3455) ; U10.158@11710,3864 11710,3890 U10.160@11710,3915 ; v1(11795,3160) 11795,3190 11785,3200 11710,3200 11710,3199 v1(11585,3199) 11585,2955 11595,2945 11690,2945 U10.122@11710,2943 ; v1(11845,3915) U10.160@11710,3915
  Mid-Layer 2 w7.87: v1(10575,2940) 10690,2940 10710,2960 v1(10710,3135) 10710,3635 ; v1(10680,3880) 10680,3790 10710,3760 10710,3635 ; v1(11625,3635) 10710,3635 ; v1(11795,3160) v1(11795,3455) 11819,3455 11829,3465 11829,3600 v1(11795,3634)
  Bottom Layer w7.87: v1(10570,3890) 10660,3890 10660,3880 v1(10680,3880) ; C14.1@10655,3135 v1(10710,3135) ; C12.1@11495,3198.98 v1(11585,3199) ; C2.1@11495,3705 11555,3705 v1(11625,3635) ; v1(11795,3634) 11801,3640 11890,3640 11895,3645 11855,3645 11845,3655 11845,3820 v1(11845,3915)
/pal-ntsc.sch/Y-VIDEO: D1.2 D2.1 R3.1 U10.156 | length 2399.8
  top_copper w7.87: U10.156@11710,3813 11775,3813 11785,3803 11785,3750 v1(11800,3735)
  Bottom Layer w7.87: D2.1@10135,4110 10225,4110 10305,4030 10398.42,4030 D1.2@10406.54,4021.88 10478.12,4021.88 10490,4010 11220,4010 11330,3900 11635,3900 v1(11800,3735) 11755,3690 11755,3605 11765,3595 11940,3595 11950,3605 11950,3635 11960,3645 R3.1@11990,3645
/pal-ntsc.sch/Y_SYNC: R20.2 R35.2 U10.6 | length 495.9
  top_copper w7.87: U10.6@11467,4030 11467,4095 v1(11510,4138) 11545,4173 11695,4173 11714.65,4153.35 R35.2@11807.32,4153.35
  Bottom Layer w7.87: R20.2@11460,4140 11475,4138 v1(11510,4138)
/PCA0: U8.17 U9.24 U10.84 U23.65 | length 12839.5
  top_copper w7.87: U23.65@1978,3320 1978,3485 1995,3502 1995,3606.81 1985,3616.81 1985,3775 2025,3815 v1(2025,4105) ; U8.17@10645,1690 10675,1690 10685,1700 v1@10685,2710 ; U10.84@10674,2802 10674,2725 10680,2725 10685,2720 v1@10685,2710 ; v1(10675,2710) v1@10685,2710
  Mid-Layer 1 w7.87: v1(2025,4105) 2070,4150 4095,4150 4140,4105 4225,4105 4275,4055 4275,4000 4295,3980 4295,3855 4320,3830 4435,3830 4535,3930 4535,4110 4545,4120 9460,4120 9520,4060 9790,4060 9865,4135 10055,4135 10080,4110 10080,4080 10090,4070 10480,4070 v1(10500,4050)
  Mid-Layer 2 w7.87: v1(10500,4050) 10500,4030 10485,4015 10485,2920 10525,2880 10635,2880 10675,2840 v1(10675,2710) ; U8.17@10645,1690 10700,1635 10780,1635 10795,1620 10860,1620 10880,1600 U9.24@10915,1600
/PCA1: U8.18 U9.25 U10.85 U23.64 | length 12434.9
  top_copper w7.87: U23.64@2004,3320 2004,3385 2010,3385 2010,3470 2105,3565 2105,3820 2080,3845 v1(2080,4105) ; v1(10685,2900) 10685,2875 10695,2865 10699,2865 10699,2802 10699,2735 10705,2735 10705,1800 10715,1790 U8.18@10745,1790
  Mid-Layer 2 w7.87: v1(2080,4105) 2097.5,4122.5 2567.5,4122.5 2570,4120 2570,4065 2580,4055 2655,4055 2705,4105 4083.81,4105 4093.12,4114.31 4121.25,4114.31 4175.57,4060 4405,4060 4455,4110 9455,4110 9505,4060 9855,4060 9945,4150 10025,4150 10035,4160 10510,4160 10520,4150 10520,4085 10545,4060 10545,4005 10515,3975 10515,2925 10540,2900 v1(10685,2900) ; U8.18@10745,1790 10895,1640 11005,1640 11015,1630 U9.25@11015,1600
/PCA2: U8.19 U9.26 U23.63 | length 11062
  top_copper w7.87: U23.63@2029,3320 2030,3315 v1(2030,3260) ; v1(5085,3270) 5110,3245 5110,3105 5165,3050 5165,2305 v1(5130,2270) ; v1(10585,2280) 10585,2260 10605,2240 10605,1830 U8.19@10645,1790
  Mid-Layer 2 w7.87: U8.19@10645,1790 10600,1745 10600,1575 10625,1550 10905,1550 10915,1540 U9.26@10915,1500
  Bottom Layer w7.87: v1(2030,3260) 2030,3280 2040,3290 2860,3290 2900,3250 3065,3250 3125,3310 3300,3310 3320,3330 3795,3330 3805,3320 3975,3320 3995,3300 4265,3300 4320,3245 4395,3245 4435,3285 5030,3285 5045,3270 v1(5085,3270) ; v1(5130,2270) 5165,2235 5190,2235 5225,2270 7650,2270 7665,2255 8065,2255 8140,2330 8670,2330 8710,2370 9260,2370 9280,2350 9670,2350 9710,2390 10145,2390 10175,2360 10230,2360 10280,2310 10415,2310 10425,2300 10425,2265 10435,2255 10480,2255 10505,2280 v1(10585,2280)
/PTADR-: RR5.5 U11.107 U23.24 U24.14 | length 6410.8
  top_copper w7.87: RR5.5@1640,1075 1645,1080 1645,1245 1635,1255 1510,1255 1480.55,1284.45 1480.55,1510.55 1510,1540 1955,1540 1965,1550 v1(1965,2205) ; U23.24@2183,2690 2183,2575 2190,2575 2335,2430 2375,2430 2400,2405 v1(2400,2220) ; v1(3265,1450) 3265,1705 3275,1714.3 3275,1865 3297,1885 3297,1943 v1@3297,2200 ; v1(3285,2200) v1@3297,2200 ; U24.14@3297,2340 3297,2275 3305,2275 3305,2215 3297,2215 v1@3297,2200
  Bottom Layer w7.87: RR5.5@1640,1075 1755,1190 2770,1190 2865,1285 3150,1285 3265,1400 v1(3265,1450) ; v1(1965,2205) 2010,2205 2025,2220 v1(2400,2220) 2415,2205 2950,2205 2970,2185 3225,2185 3240,2200 v1(3285,2200)
/PTATN-: RR5.2 U11.114 U23.18 U24.4 | length 4561.8
  top_copper w7.87: U23.18@2029,2690 2029,2486 2165,2350 v1(2165,2150) ; U24.4@3041,2340 3041,2124 v1(3065,2100) 3118,2047 3118,1943 3118,1450 v1(3115,1450)
  Bottom Layer w7.87: RR5.2@1340,1075 1340,1200 1390,1250 2740,1250 2835,1345 3060,1345 3115,1400 v1(3115,1450) ; v1(2165,2150) 2320,1995 2960,1995 v1(3065,2100)
/PTBE-0: U11.116 U23.20 U24.158 | length 2166.6
  top_copper w7.87: U23.20@2080,2690 2080,2535 2265,2350 v1(2265,2150) ; U24.158@2850,2506 2776,2506 2765,2495 2765,2350 2915,2200 v1(2915,2150) 2915,2100 2950,2065 3015,2065 3067,2013 U11.116@3067,1943
  Bottom Layer w7.87: v1(2265,2150) 2380,2035 2800,2035 v1(2915,2150)
/PTBE-1: U11.118 U23.21 U24.157 | length 2095.1
  top_copper w7.87: U23.21@2106,2690 2106,2559 2315,2350 v1(2315,2150) ; U24.157@2850,2531 2766,2531 2745,2510 2745,2320 2865,2200 v1(2865,2150) 2865,2100 2920,2045 3000,2045 3016,2029 U11.118@3016,1943
  Bottom Layer w7.87: v1(2315,2150) 2410,2055 2770,2055 v1(2865,2150)
/PTBE-2: U11.119 U23.22 U24.156 | length 2027.3
  top_copper w7.87: U23.22@2132,2690 2132,2560 2365,2327 v1(2365,2150) ; U24.156@2850,2557 2765,2557 2730,2520.2 2725,2515 2725,2290 2815,2200 v1(2815,2150) 2815,2100 2890,2025 2982,2025 2990,2017 U11.119@2990,1943
  Bottom Layer w7.87: v1(2365,2150) 2440,2075 2740,2075 v1(2815,2150)
/PTBE-3: U11.120 U23.23 U24.155 | length 1670.3
  top_copper w7.87: U23.23@2157,2690 2160,2690 2160,2560 2330,2390 v1(2350,2390) ; v1(2695,2375) v1@2705,2375 ; U24.155@2850,2583 2785,2583 2785,2575 2755,2575 2705,2525 v1@2705,2375 ; U11.120@2965,1943 2965,1950 2890,1950 2765,2075 2765,2200 2705,2260 v1@2705,2375
  Bottom Layer w7.87: v1(2350,2390) 2415,2390 2440,2365 2490,2365 2500,2375 v1(2695,2375)
/PTBURST: U11.112 U23.17 U24.5 | length 2149.5
  top_copper w7.87: U23.17@2004,2690 2004,2461 2115,2350 v1(2115,2150) ; U24.5@3067,2340 3067,2148 v1(3115,2100) 3169,2046 U11.112@3169,1943
  Bottom Layer w7.87: v1(2115,2150) 2290,1975 2990,1975 v1(3115,2100)
/PTNUM0: U11.123 U23.34 U24.150 | length 1723.5
  top_copper w7.87: U23.34@2400,2839 2475,2839 2495,2819 v1(2495,2595) ; U11.123@2850,1777 2740,1777 2665,1852 2665,2225 2645,2245 2645,2445 2665,2465 v1(2665,2595) 2665,2625 2751,2711 U24.150@2850,2711
  Bottom Layer w7.87: v1(2495,2595) v1(2665,2595)
/PTNUM1: U11.122 U23.32 U24.154 | length 1637.4
  top_copper w7.87: U23.32@2400,2787 2450,2787 2460,2777 2460,2645 2445,2630 v1(2445,2595) ; U11.122@2850,1802 2765,1802 2715,1852 2715,2205 2665,2255 2665,2440 2685,2460 2685,2530 2720,2565 v1(2720,2595) 2750,2595 2750,2608 U24.154@2850,2608
  Bottom Layer w7.87: v1(2445,2595) 2475,2565 2690,2565 v1(2720,2595)
/PTRDY-: RR6.2 U11.115 U23.19 U24.3 | length 4370
  top_copper w7.87: U23.19@2055,2690 2055,2510 2215,2350 v1(2215,2150) ; v1(3015,2100) v1@3016,2100 ; U24.3@3016,2340 v1@3016,2100 ; v1(3065,1450) 3065,1550 3093,1578 3093,1943 3093,2023 v1@3016,2100
  Bottom Layer w7.87: RR6.2@1328.58,1425 1328.58,1360.43 1414.02,1275 2735,1275 2825,1365 3030,1365 3065,1400 v1(3065,1450) ; v1(2215,2150) 2350,2015 2930,2015 v1(3015,2100)
/PTWR: U11.108 U23.16 U24.12 | length 2349.1
  top_copper w7.87: U23.16@1978,2690 1978,2640 1985,2640 1985,2430 2065,2350 v1(2065,2150) ; U24.12@3246,2340 3246,2280 3240,2280 3240,2250 3205,2250 3190,2235 3190,2125 v1(3215,2100) 3272,2043 U11.108@3272,1943
  Bottom Layer w7.87: v1(2065,2150) 2260,1955 3070,1955 v1(3215,2100)
/RAS0-: U19.34 U19.44 U24.74 | length 3862
  top_copper w7.87: U24.74@4078,3299 4190,3299 4216,3325 4250,3325 4335,3410 4335,3850 v1(4355,3870)
  Bottom Layer w7.87: v1(4355,3870) 4720,3870 4835,3985 6630,3985 6640,3975 U19.44@6640,3950 6675,3985 7280,3985 7315,3950 U19.34@7340,3950
/RAS1-: U18.34 U18.44 U24.73 | length 3720
  top_copper w7.87: U24.73@4078,3274 4234,3274 4370,3410 v1(4370,3610.63)
  Bottom Layer w7.87: v1(4370,3610.63) 4787.15,3610.63 4800.9,3624.37 4829.1,3624.37 4829.35,3624.13 5213.25,3624.13 5223.5,3634.37 5256.5,3634.37 5266.75,3624.13 5313.25,3624.13 5323.5,3634.37 5356.5,3634.37 5366.75,3624.13 5413.25,3624.13 5423.5,3634.37 5456.5,3634.37 5466.75,3624.13 5513.25,3624.13 5523.5,3634.37 5556.5,3634.37 5566.75,3624.13 5613.25,3624.13 5623.5,3634.37 5656.5,3634.37 5666.75,3624.13 5713.25,3624.13 5723.5,3634.37 5756.5,3634.37 5766.75,3624.13 5813.25,3624.13 5823.5,3634.37 5856.5,3634.37 5866.75,3624.13 5913.25,3624.13 5923.5,3634.37 5956.5,3634.37 5966.75,3624.13 6013.25,3624.13 6023.5,3634.37 6056.5,3634.37 6066.75,3624.13 6113.25,3624.13 6123.5,3634.37 6156.5,3634.37 6166.75,3624.13 6213.25,3624.13 6223.5,3634.37 6256.5,3634.37 6266.75,3624.13 6313.25,3624.13 6323.5,3634.37 6356.5,3634.37 6366.75,3624.13 6413.25,3624.13 6423.5,3634.37 6456.5,3634.37 6466.75,3624.13 6513.25,3624.13 6523.5,3634.37 6556.5,3634.37 6590.87,3600 U18.44@6640,3600 6689.13,3600 6723.5,3634.37 6756.5,3634.37 6766.75,3624.13 6813.25,3624.13 6823.5,3634.37 6856.5,3634.37 6866.75,3624.13 6913.25,3624.13 6923.5,3634.37 6956.5,3634.37 6966.75,3624.13 7041.68,3624.13 7056.68,3639.13 7163.32,3639.13 7178.32,3624.13 7213.25,3624.13 7223.5,3634.37 7256.5,3634.37 7290.87,3600 U18.34@7340,3600
/RAS2-: U17.34 U17.44 U24.69 | length 3453.1
  top_copper w7.87: U24.69@4078,3171 4186,3171 v1(4355,3340)
  Bottom Layer w7.87: v1(4355,3340) 4370,3355 5130,3355 5155,3330 6050,3330 6085,3295 6640,3295 ; U17.44@6640,3250 6640,3295 ; U17.34@7340,3250 7340,3295 6640,3295
/RAS3-: U15.34 U15.44 U24.68 | length 3830.1
  top_copper w7.87: U24.68@4078,3146 4210,3146 4279,3215 4279,3240 4335,3296 v1(4355,3296) ; v1(6590,3225) 6615,3225 6640,3200 U15.44@6640,2900
  Bottom Layer w7.87: v1(4355,3296) 4389,3330 5125,3330 5145,3310 6045,3310 6095,3260 6095,3230 6110,3215 6570,3215 6580,3225 v1(6590,3225) ; U15.44@6640,2900 6640,2875 6650,2865 6965,2865 7030,2930 7150,2930 7215,2865 7280,2865 7315,2900 U15.34@7340,2900
/RAS4-: U16.34 U16.44 U24.67 | length 3883.8
  top_copper w7.87: U24.67@4078,3120 4555,3120 4595,3080 4595,3065 4605,3055 v1(4810,3055) ; v1(6595,3085) 6605,3075 6605,2865 6645,2825 6645,2600 6640,2600 U16.44@6640,2550
  Bottom Layer w7.87: v1(4810,3055) 5745,3055 5765,3075 6290,3075 6310,3095 6565,3095 6575,3085 v1(6595,3085) ; U16.44@6640,2550 6700,2610 7280,2610 U16.34@7340,2550